# Altium PCB Grabber.PCBDOC (part 4 of 5)
Units mm, origin at the board's own origin, x right, y up, seen from the top; angles counter-clockwise.
Board outline 72.5 x 100 mm, 4 copper layers (TopLayer, Internal Plane 2, Layer 1, Bottom Layer), stack 1.543 mm thick; 160 components, 116 nets, 692 pads, 242 vias.
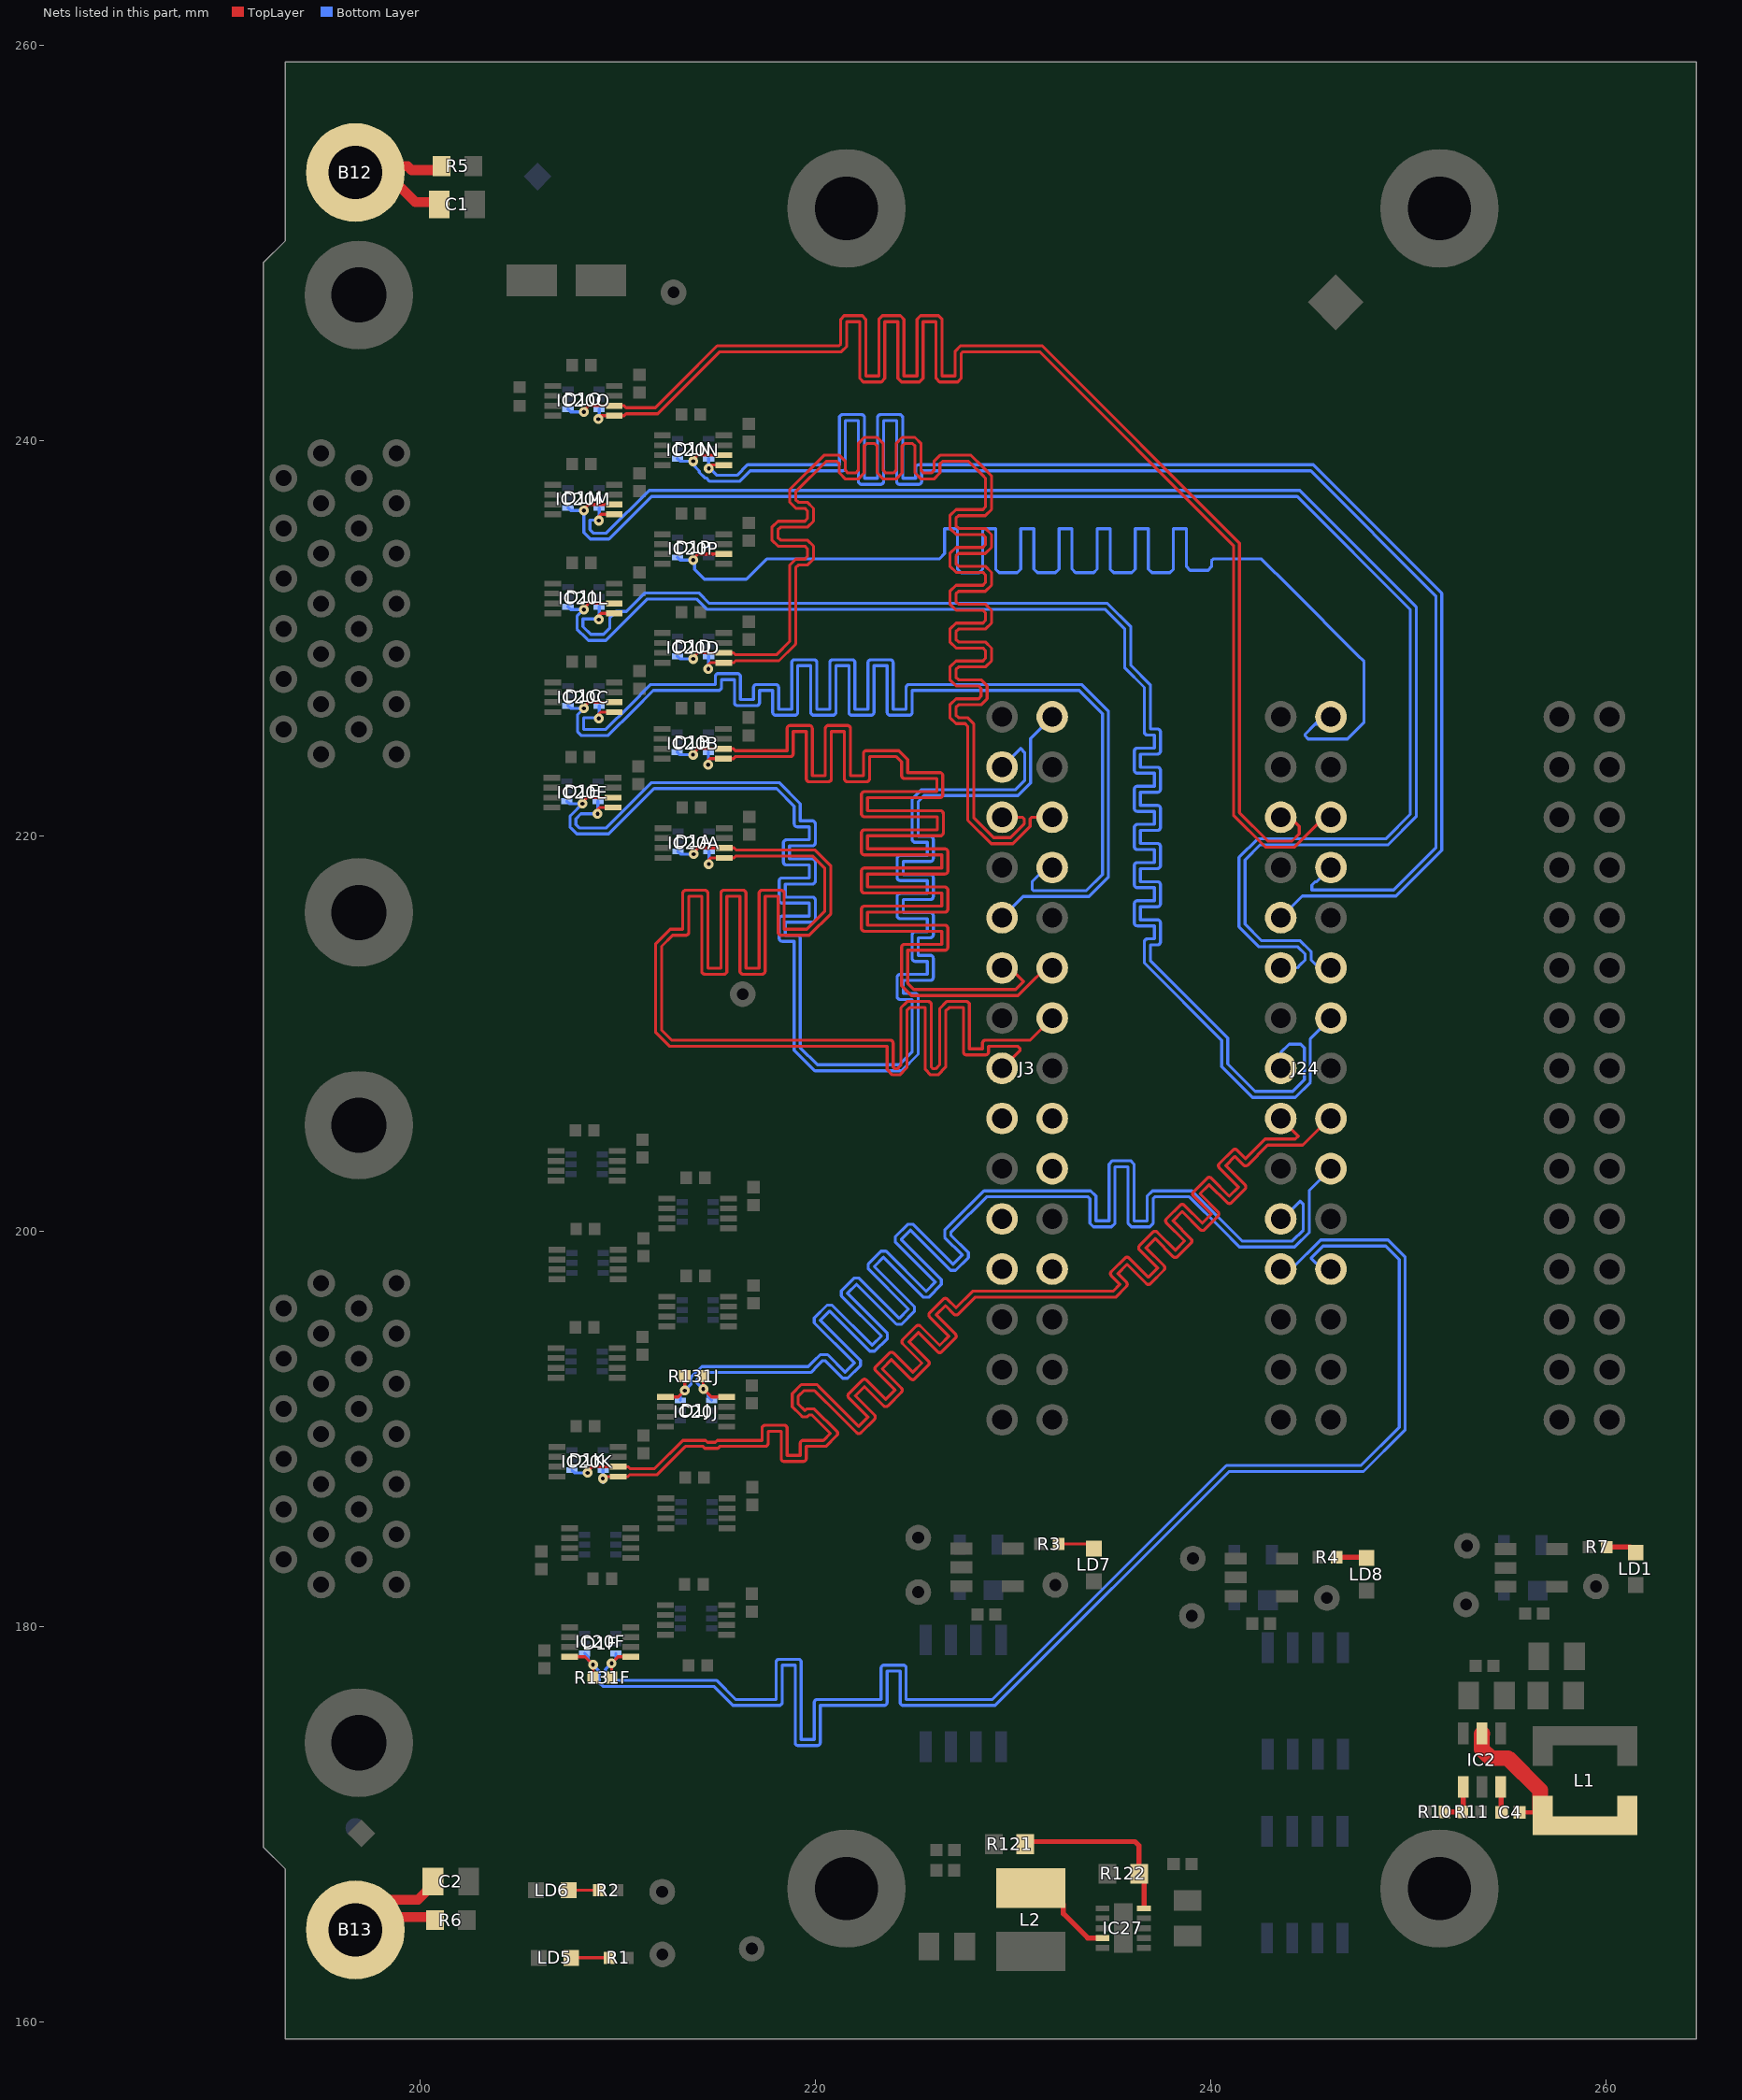
[diagram p5: the nets of this part, all layers, seen from the top]

## Via types
v1: diameter 0.5, hole 0.2, TopLayer to Bottom Layer, tented both sides, 242 vias

## Nets (pads, with @x,y where several pads share a name; then routed paths per layer and width w, separated by ;. In a path a pad name is that pad's centre, name@x,y a point inside that pad or via, vN(x,y) a via of type N, cw(c..) or ccw(c..) an arc to the next point about the centre after c; other vN are vias at no path point) (continued)
LVDS8_P: D1P.1 IC20P.6 J24.2 | length 78.1
  TopLayer w0.152: v1(213.838,233.965) 213.838,234.034 214.077,234.273 IC20P.6@215.377,234.273
  Bottom Layer w0.152: D1P.1@213.037,234.098 213.17,233.965 v1(213.838,233.965) 213.905,233.899 213.905,233.49 214.402,232.993 216.528,232.993 217.558,234.023 225.992,234.023 226.284,234.023 226.552,234.291 226.552,235.547 227.212,235.547 227.212,233.505 227.391,233.326 228.304,233.326 228.482,233.505 228.482,235.547 229.142,235.547 229.142,233.505 229.321,233.326 230.234,233.326 230.412,233.505 230.412,235.547 231.073,235.547 231.073,233.505 231.251,233.326 232.164,233.326 232.343,233.505 232.343,235.547 233.003,235.547 233.003,233.505 233.182,233.326 234.095,233.326 234.273,233.505 234.273,235.547 234.934,235.547 234.934,233.505 235.112,233.326 236.025,233.326 236.204,233.505 236.204,235.547 236.864,235.547 236.864,233.505 237.043,233.326 237.956,233.326 238.134,233.505 238.134,235.547 238.794,235.547 238.794,233.63 238.973,233.451 239.886,233.451 240.064,233.63 240.064,233.934 240.154,234.023 240.436,234.023 242.582,234.023 244.043,232.562 247.438,229.167 247.777,228.829 247.777,225.755 246.939,224.917 244.945,224.917 244.793,225.069 244.793,225.159 245.288,225.654 ; 245.288,225.654 245.669,226.035 J24.2@246.101,226.035 245.72,225.654 245.288,225.654
LVDS9_N: D1O.6 IC20O.5 J24.6 | length 75.7
  TopLayer w0.152: v1(209.042,241.098) 209.042,241.148 209.168,241.273 IC20O.5@209.842,241.273 210.344,241.273 210.441,241.371 212.049,241.371 215.178,244.5 220.701,244.5 221.336,244.5 221.604,244.768 221.604,246.024 222.264,246.024 222.264,243.155 222.443,242.976 223.356,242.976 223.534,243.155 223.534,246.024 224.195,246.024 224.195,243.155 224.373,242.976 225.286,242.976 225.465,243.155 225.465,246.024 226.125,246.024 226.125,243.155 226.304,242.976 227.217,242.976 227.395,243.155 227.395,244.411 227.484,244.5 227.65,244.5 231.369,244.5 241.173,234.696 241.173,221.057 242.787,219.443 244.258,219.443 245.77,220.955 J24.6@246.101,220.955
  Bottom Layer w0.152: v1(209.042,241.098) 209.042,241.015 209.082,240.974 D1O.6@209.082,241.598
LVDS9_P: D1O.1 IC20O.6 J24.5 | length 76
  TopLayer w0.152: v1(208.303,241.465) 208.303,241.534 208.542,241.773 IC20O.6@209.842,241.773 210.344,241.773 210.441,241.676 211.923,241.676 213.096,242.849 215.052,244.805 220.701,244.805 221.21,244.805 221.299,244.894 221.299,246.151 221.478,246.329 222.391,246.329 222.569,246.151 222.569,243.281 223.23,243.281 223.23,246.151 223.408,246.329 224.321,246.329 224.5,246.151 224.5,243.281 225.16,243.281 225.16,246.151 225.339,246.329 226.251,246.329 226.43,246.151 226.43,243.281 227.09,243.281 227.09,244.537 227.358,244.805 227.65,244.805 231.495,244.805 241.478,234.822 241.478,221.183 242.913,219.748 244.132,219.748 244.5,220.116 244.5,220.497 244.043,220.955 J24.5@243.561,220.955
  Bottom Layer w0.152: D1O.1@207.502,241.598 207.635,241.465 v1(208.303,241.465)
LVDS10_N: D1N.6 IC20N.5 J24.9 | length 76.7
  TopLayer w0.152: v1(214.627,238.596) 214.627,238.698 214.703,238.773 IC20N.5@215.377,238.773
  Bottom Layer w0.152: D1N.6@214.617,239.098 v1@214.617,238.679 ; v1(214.627,238.596) 214.627,238.669 v1@214.617,238.679 ; J24.9@243.561,215.875 244.653,216.967 245.135,216.967 249.402,216.967 251.714,219.279 251.714,232.282 245.211,238.785 225.247,238.785 ccw(c225.247,238.633) 225.095,238.633 225.095,238.1 224.434,238.1 224.434,241.173 ccw(c224.282,241.173) 224.282,241.325 223.317,241.325 ccw(c223.317,241.173) 223.164,241.173 223.164,238.1 222.504,238.1 222.504,241.173 ccw(c222.352,241.173) 222.352,241.325 221.386,241.325 ccw(c221.386,241.173) 221.234,241.173 221.234,238.785 216.586,238.785 216.052,238.252 215.045,238.252 v1@214.617,238.679
LVDS10_P: D1N.1 IC20N.6 J24.8 | length 77.6
  TopLayer w0.152: v1(213.838,238.965) 213.838,239.034 214.077,239.273 IC20N.6@215.377,239.273
  Bottom Layer w0.152: D1N.1@213.037,239.098 213.17,238.965 v1(213.838,238.965) 213.838,238.782 214.149,238.471 214.149,238.398 214.429,238.118 214.502,238.118 214.673,237.947 215.045,237.947 216.179,237.947 216.712,238.481 221.386,238.481 ccw(c221.386,238.633) 221.539,238.633 221.539,241.021 222.199,241.021 222.199,237.947 ccw(c222.352,237.947) 222.352,237.795 223.317,237.795 ccw(c223.317,237.947) 223.469,237.947 223.469,241.021 224.13,241.021 224.13,237.947 ccw(c224.282,237.947) 224.282,237.795 225.247,237.795 ccw(c225.247,237.947) 225.4,237.947 225.4,238.481 245.085,238.481 251.409,232.156 251.409,219.405 249.276,217.272 245.135,217.272 245.135,217.526 245.3,217.691 245.377,217.691 J24.8@246.101,218.415
LVDS11_N: D1M.6 IC20M.5 J24.12 | length 77
  TopLayer w0.152: v1(209.065,235.964) 209.065,236.178 209.168,236.28 IC20M.5@209.842,236.28
  Bottom Layer w0.152: 208.763,235.331 209.448,235.331 211.607,237.49 222.162,237.49 233.21,237.49 244.525,237.49 250.419,231.596 250.419,220.982 248.994,219.558 242.518,219.558 241.757,218.796 241.757,215.544 242.595,214.706 244.551,214.706 245.008,214.249 245.098,214.16 245.098,213.741 J24.12@245.339,213.5 ; 208.763,235.356 208.61,235.509 208.61,235.994 209.036,235.994 v1(209.065,235.964) 209.082,235.981 D1M.6@209.082,236.605 ; J24.12@245.504,213.335 J24.12@245.339,213.5 ; J24.12@246.101,213.335 245.935,213.5 J24.12@245.339,213.5
LVDS11_P: D1M.1 IC20M.6 J24.11 | length 77.9
  TopLayer w0.152: v1(208.303,236.472) 208.303,236.541 208.542,236.78 IC20M.6@209.842,236.78
  Bottom Layer w0.152: D1M.1@207.502,236.605 207.635,236.472 v1(208.303,236.472) 208.303,235.359 208.636,235.026 209.575,235.026 211.734,237.185 222.036,237.185 233.336,237.185 244.399,237.185 250.114,231.47 250.114,221.108 248.868,219.862 242.392,219.862 241.452,218.923 241.452,215.418 242.38,214.491 242.469,214.401 244.425,214.401 244.793,214.033 244.793,213.729 244.552,213.488 244.399,213.335 J24.11@243.561,213.335
LVDS12_N: D1L.6 IC20L.5 J24.15 | length 75.7
  TopLayer w0.152: v1(209.065,230.957) 209.065,231.171 209.168,231.273 IC20L.5@209.842,231.273
  Bottom Layer w0.152: D1L.6@209.082,231.598 209.082,230.974 v1(209.065,230.957) 209.036,230.987 208.262,230.987 208.262,230.599 208.657,230.204 209.298,230.204 209.613,230.519 209.613,231.042 209.94,231.369 210.464,231.369 211.397,232.303 214.122,232.303 214.644,231.781 234.791,231.781 235.979,230.593 235.979,228.637 236.967,227.649 236.967,225.418 237.322,225.418 cw(c237.322,225.266) 237.475,225.266 237.475,224.301 cw(c237.322,224.301) 237.322,224.148 236.459,224.148 236.459,223.488 237.322,223.488 cw(c237.322,223.335) 237.475,223.335 237.475,222.37 cw(c237.322,222.37) 237.322,222.218 236.459,222.218 236.459,221.557 237.322,221.557 cw(c237.322,221.405) 237.475,221.405 237.475,220.44 cw(c237.322,220.44) 237.322,220.287 236.459,220.287 236.459,219.627 237.322,219.627 cw(c237.322,219.475) 237.475,219.475 237.475,218.509 cw(c237.322,218.509) 237.322,218.357 236.459,218.357 236.459,217.697 237.322,217.697 cw(c237.322,217.544) 237.475,217.544 237.475,216.579 cw(c237.322,216.579) 237.322,216.427 236.459,216.427 236.459,215.766 237.322,215.766 cw(c237.322,215.614) 237.475,215.614 237.475,214.649 cw(c237.322,214.649) 237.322,214.496 236.967,214.496 236.967,213.705 240.792,209.88 240.881,209.791 240.881,208.469 242.264,207.086 244.17,207.086 244.754,207.67 244.754,209.296 244.577,209.474 243.992,209.474 243.561,209.042 J24.15@243.561,208.255
LVDS12_P: D1L.1 IC20L.6 J24.14 | length 76.8
  TopLayer w0.152: v1(208.303,231.465) 208.303,231.534 208.542,231.773 IC20L.6@209.842,231.773
  Bottom Layer w0.152: D1L.1@207.502,231.598 207.635,231.465 v1(208.303,231.465) 207.958,231.12 207.958,230.473 208.442,229.989 208.531,229.9 209.425,229.9 209.514,229.989 211.523,231.998 213.996,231.998 214.518,231.476 234.665,231.476 235.674,230.467 235.674,228.511 236.662,227.523 236.662,225.266 ccw(c236.814,225.266) 236.814,225.113 237.17,225.113 237.17,224.453 236.306,224.453 ccw(c236.306,224.301) 236.154,224.301 236.154,223.335 ccw(c236.306,223.335) 236.306,223.183 237.17,223.183 237.17,222.523 236.306,222.523 ccw(c236.306,222.37) 236.154,222.37 236.154,221.405 ccw(c236.306,221.405) 236.306,221.253 237.17,221.253 237.17,220.592 236.306,220.592 ccw(c236.306,220.44) 236.154,220.44 236.154,219.475 ccw(c236.306,219.475) 236.306,219.322 237.17,219.322 237.17,218.662 236.306,218.662 ccw(c236.306,218.509) 236.154,218.509 236.154,217.544 ccw(c236.306,217.544) 236.306,217.392 237.17,217.392 237.17,216.731 236.306,216.731 ccw(c236.306,216.579) 236.154,216.579 236.154,215.614 ccw(c236.306,215.614) 236.306,215.461 237.17,215.461 237.17,214.801 236.814,214.801 ccw(c236.814,214.649) 236.662,214.649 236.662,213.579 240.576,209.665 240.576,208.343 242.138,206.781 244.296,206.781 245.059,207.544 245.059,209.753 J24.14@246.101,210.795
LVDS13_N: D1K.6 IC20K.5 J24.18 | length 78.1
  TopLayer w0.152: v1(209.266,187.503) 209.363,187.599 IC20K.5@210.037,187.599 210.539,187.599 210.636,187.697 212.013,187.697 213.444,189.128 214.33,189.128 214.433,189.025 215.082,189.025 215.185,189.128 217.475,189.128 ccw(c217.475,189.281) 217.627,189.281 217.627,189.89 218.288,189.89 218.288,188.519 ccw(c218.44,188.519) 218.44,188.366 219.405,188.366 ccw(c219.405,188.519) 219.558,188.519 219.558,189.128 220.553,189.128 221.1,189.676 ccw(c220.993,189.784) 221.145,189.784 ccw(c220.993,189.784) 221.1,189.891 ; 221.1,189.892 219.971,191.021 219.571,191.021 219.481,190.932 219.151,191.262 219.151,191.668 219.431,191.948 219.978,191.948 220.084,191.841 221.136,190.789 221.305,190.621 222.106,189.82 ccw(c222.214,189.927) 222.322,189.82 ; 222.322,189.82 223.004,190.502 ; 223.004,190.718 222.034,191.688 222.501,192.154 223.471,191.185 ccw(c223.579,191.292) 223.687,191.185 ; 223.004,190.502 ccw(c222.896,190.61) 223.049,190.61 ccw(c222.896,190.61) 223.004,190.718 ; 223.687,191.185 224.369,191.867 ccw(c224.261,191.975) 224.414,191.975 ccw(c224.261,191.975) 224.369,192.083 223.399,193.053 223.866,193.519 224.836,192.55 ccw(c224.944,192.657) 225.052,192.55 225.734,193.232 ccw(c225.626,193.34) 225.779,193.34 ccw(c225.626,193.34) 225.734,193.448 224.764,194.418 225.231,194.884 226.201,193.915 ccw(c226.309,194.022) 226.417,193.915 227.099,194.597 ccw(c226.991,194.705) 227.144,194.705 ccw(c226.991,194.705) 227.099,194.813 226.129,195.783 226.596,196.249 227.027,195.818 ccw(c227.135,195.926) 227.243,195.818 ; 227.243,195.819 228.097,196.672 235.203,196.672 235.751,197.22 ccw(c235.643,197.327) 235.795,197.327 ccw(c235.643,197.327) 235.75,197.436 235.32,197.866 235.787,198.333 236.757,197.363 ccw(c236.864,197.471) 236.973,197.364 237.655,198.046 ccw(c237.547,198.154) 237.699,198.154 ccw(c237.547,198.154) 237.654,198.262 236.744,199.172 237.211,199.639 238.122,198.728 ccw(c238.229,198.836) 238.338,198.729 239.02,199.411 ccw(c238.912,199.519) 239.064,199.519 ccw(c238.912,199.519) 239.02,199.626 238.109,200.537 238.576,201.004 239.487,200.093 ccw(c239.594,200.201) 239.703,200.094 240.384,200.775 ccw(c240.277,200.884) 240.429,200.884 ccw(c240.277,200.884) 240.384,200.992 239.474,201.902 239.941,202.369 240.852,201.458 ccw(c240.959,201.566) 241.068,201.459 241.75,202.141 ccw(c241.642,202.249) 241.794,202.249 ccw(c241.642,202.249) 241.75,202.356 240.78,203.326 241.247,203.793 241.678,203.362 ccw(c241.786,203.47) 241.894,203.363 242.899,204.368 244.677,204.368 246.024,205.715 J24.18@246.101,205.715
  Bottom Layer w0.152: v1(209.266,187.503) 209.266,187.312 209.277,187.3 D1K.6@209.277,187.924
LVDS13_P: D1K.1 IC20K.6 J24.17 | length 78
  TopLayer w0.152: v1(208.498,187.791) 208.498,187.86 208.737,188.099 IC20K.6@210.037,188.099 210.539,188.099 210.636,188.002 211.887,188.002 213.318,189.433 214.456,189.433 214.559,189.33 214.956,189.33 215.059,189.433 217.322,189.433 217.322,190.043 cw(c217.475,190.043) 217.475,190.195 218.44,190.195 cw(c218.44,190.043) 218.592,190.043 218.592,188.671 219.253,188.671 219.253,189.281 cw(c219.405,189.281) 219.405,189.433 220.427,189.433 220.777,189.784 219.845,190.716 219.697,190.716 219.608,190.627 219.355,190.627 219.266,190.716 218.846,191.136 218.846,191.795 219.304,192.253 220.104,192.253 220.3,192.057 222.214,190.143 222.681,190.61 221.712,191.579 cw(c221.819,191.688) 221.711,191.795 222.394,192.478 cw(c222.501,192.37) 222.609,192.478 223.579,191.508 224.046,191.975 223.076,192.945 cw(c223.184,193.053) 223.076,193.16 ; 223.077,193.161 223.759,193.843 cw(c223.866,193.735) 223.974,193.843 224.944,192.873 225.411,193.34 224.442,194.309 ; 224.441,194.31 cw(c224.549,194.418) 224.441,194.525 225.123,195.207 ; 225.124,195.208 cw(c225.231,195.1) 225.339,195.208 226.309,194.238 226.776,194.705 225.806,195.675 cw(c225.914,195.783) 225.806,195.89 ; 225.807,195.891 226.489,196.573 cw(c226.596,196.465) 226.704,196.573 227.135,196.142 227.97,196.977 235.077,196.977 235.427,197.327 234.996,197.759 cw(c235.104,197.866) 234.997,197.975 235.679,198.657 cw(c235.787,198.549) 235.895,198.656 236.864,197.687 237.331,198.154 236.421,199.064 cw(c236.528,199.172) 236.42,199.28 237.103,199.963 cw(c237.211,199.855) 237.319,199.962 238.229,199.052 238.696,199.519 237.785,200.429 cw(c237.893,200.537) 237.786,200.645 238.468,201.328 cw(c238.576,201.22) 238.684,201.327 239.594,200.417 240.061,200.884 239.151,201.794 cw(c239.258,201.902) 239.15,202.01 239.833,202.693 cw(c239.941,202.585) 240.049,202.693 240.959,201.782 241.426,202.249 240.456,203.219 cw(c240.564,203.326) 240.457,203.435 241.139,204.117 cw(c241.247,204.009) 241.354,204.117 241.786,203.686 242.773,204.673 244.297,204.673 244.45,204.826 J24.17@243.561,205.715
  Bottom Layer w0.152: D1K.1@207.697,187.924 207.83,187.791 v1(208.498,187.791)
LVDS14_N: D1J.3 IC20J.1 J24.21 R131J.1 | length 77.2
  TopLayer w0.152: IC20J.1@212.434,191.624 213.084,191.624 v1(213.409,191.949) R131J.1@213.409,192.674
  Bottom Layer w0.152: D1J.3@213.194,191.449 213.194,191.734 v1(213.409,191.949) 213.727,192.267 213.727,192.619 214.275,193.167 219.659,193.167 219.939,193.446 220.259,193.767 220.638,193.767 221.526,192.879 221.993,193.346 219.964,195.375 219.964,195.627 220.61,196.273 220.862,196.273 222.891,194.244 223.358,194.711 221.329,196.74 221.329,196.992 221.975,197.638 222.227,197.638 224.256,195.609 224.723,196.076 222.694,198.105 222.694,198.357 223.34,199.003 223.592,199.003 225.621,196.974 226.088,197.441 224.059,199.47 224.059,199.722 224.705,200.368 224.957,200.368 226.986,198.339 227.453,198.806 226.565,199.694 226.565,200.073 226.771,200.279 228.549,202.057 233.477,202.057 233.945,202.057 234.213,201.789 234.213,200.537 234.873,200.537 234.873,203.402 235.052,203.581 235.964,203.581 236.143,203.402 236.143,200.533 236.803,200.533 236.803,201.789 237.071,202.057 237.363,202.057 239.064,202.057 241.604,199.517 244.145,199.517 244.704,200.076 244.704,201.371 244.538,201.536 243.637,200.635 J24.21@243.561,200.635
LVDS14_P: D1J.4 IC20J.8 J24.20 R131J.2 | length 78.1
  TopLayer w0.152: R131J.2@214.349,192.674 v1(214.349,192.028) 214.753,191.624 IC20J.8@215.534,191.624
  Bottom Layer w0.152: D1J.4@214.774,191.449 214.584,191.639 214.584,191.793 v1(214.349,192.028) 214.032,192.346 214.032,192.493 214.401,192.862 219.785,192.862 220.154,193.231 220.385,193.462 220.512,193.462 221.4,192.574 221.652,192.574 222.298,193.219 222.298,193.472 220.269,195.501 220.736,195.968 222.765,193.939 223.017,193.939 223.663,194.584 223.663,194.837 221.634,196.866 222.101,197.333 224.13,195.304 224.382,195.304 225.028,195.949 225.028,196.202 222.999,198.231 223.466,198.698 225.495,196.669 225.747,196.669 226.393,197.314 226.393,197.567 224.364,199.596 224.831,200.063 226.86,198.034 227.112,198.034 227.758,198.679 227.758,198.932 226.87,199.82 226.87,199.946 226.987,200.063 228.675,201.752 233.477,201.752 233.819,201.752 233.908,201.663 233.908,200.411 234.086,200.233 234.999,200.233 235.178,200.411 235.178,203.276 235.838,203.276 235.838,200.407 236.017,200.228 236.93,200.228 237.108,200.407 237.108,201.663 237.198,201.752 237.363,201.752 238.938,201.752 240.538,200.152 241.478,199.212 244.271,199.212 245.008,199.95 245.008,202.082 J24.20@246.101,203.175
LVDS15_N: D1F.3 IC20F.1 J24.24 R131F.1 | length 75.7
  TopLayer w0.152: R131F.1@209.71,177.43 v1(209.71,178.155) 210.035,178.48 IC20F.1@210.685,178.48
  Bottom Layer w0.152: D1F.3@209.925,178.655 209.925,178.37 v1(209.71,178.155) 209.393,177.838 209.393,177.292 215.011,177.292 215.976,176.327 218.034,176.327 218.034,178.206 cw(c218.186,178.206) 218.186,178.359 219.151,178.359 cw(c219.151,178.206) 219.304,178.206 219.304,174.295 219.964,174.295 219.964,176.174 cw(c220.116,176.174) 220.116,176.327 223.342,176.327 223.342,177.909 cw(c223.495,177.909) 223.495,178.061 224.46,178.061 cw(c224.46,177.909) 224.612,177.909 224.612,176.327 228.981,176.327 240.817,188.163 247.625,188.163 249.555,190.094 249.555,198.577 248.869,199.263 245.707,199.263 245.098,198.653 245.656,198.095 J24.24@246.101,198.095
LVDS15_P: D1F.4 IC20F.8 J24.23 R131F.2 | length 78.1
  TopLayer w0.152: IC20F.8@207.585,178.48 208.366,178.48 v1(208.77,178.076) R131F.2@208.77,177.43
  Bottom Layer w0.152: D1F.4@208.345,178.655 208.535,178.465 208.535,178.311 v1(208.77,178.076) 209.088,177.759 209.088,177.166 209.267,176.987 214.885,176.987 215.761,176.111 215.85,176.022 218.186,176.022 ccw(c218.186,176.174) 218.338,176.174 218.338,178.054 218.999,178.054 218.999,174.142 ccw(c219.151,174.142) 219.151,173.99 220.116,173.99 ccw(c220.116,174.142) 220.269,174.142 220.269,176.022 223.495,176.022 ccw(c223.495,176.174) 223.647,176.174 223.647,177.756 224.307,177.756 224.307,176.174 ccw(c224.46,176.174) 224.46,176.022 229.107,176.022 229.197,176.111 240.944,187.858 247.751,187.858 249.771,189.878 249.86,189.967 249.86,198.703 249.771,198.793 248.995,199.568 245.581,199.568 244.108,198.095 J24.23@243.561,198.095
LVDS16_N: D1E.6 IC20E.5 J3.3 | length 75
  TopLayer w0.152: v1@208.916,221.048 v1(209,221.132) 209,221.346 209.103,221.448 IC20E.5@209.777,221.448
  Bottom Layer w0.152: D1E.6@209.017,221.773 209.017,221.149 v1(209,221.132) 208.189,221.132 208.175,221.146 207.908,220.879 207.908,220.583 208.076,220.414 209.442,220.414 211.735,222.707 218.185,222.707 219.253,221.64 219.253,220.777 219.862,220.777 cw(c219.862,220.624) 220.015,220.624 220.015,219.659 cw(c219.862,219.659) 219.862,219.507 218.705,219.507 218.705,218.846 219.862,218.846 cw(c219.862,218.694) 220.015,218.694 220.015,217.729 cw(c219.862,217.729) 219.862,217.576 218.491,217.576 218.491,216.916 219.862,216.916 cw(c219.862,216.764) 220.015,216.764 220.015,215.798 cw(c219.862,215.798) 219.862,215.646 218.491,215.646 218.491,214.986 219.1,214.986 cw(c219.1,214.833) 219.253,214.833 219.253,209.296 220.116,208.432 224.257,208.432 224.917,209.093 224.917,211.734 224.307,211.734 cw(c224.307,211.887) 224.155,211.887 224.155,212.852 cw(c224.307,212.852) 224.307,213.004 225.679,213.004 225.679,213.665 225.069,213.665 cw(c225.069,213.817) 224.917,213.817 224.917,215.011 cw(c225.069,215.011) 225.069,215.163 225.679,215.163 225.679,215.824 224.307,215.824 cw(c224.307,215.976) 224.155,215.976 224.155,216.941 cw(c224.307,216.941) 224.307,217.094 225.679,217.094 225.679,217.754 224.307,217.754 cw(c224.307,217.907) 224.155,217.907 224.155,218.872 cw(c224.307,218.872) 224.307,219.024 225.679,219.024 225.679,219.685 225.069,219.685 cw(c225.069,219.837) 224.917,219.837 224.917,221.88 225.389,222.352 230.149,222.352 230.606,222.808 230.606,224.232 230.403,224.434 J3.3@229.464,223.495
LVDS16_P: D1E.1 IC20E.6 J3.2 | length 77.2
  TopLayer w0.152: v1(208.238,221.64) 208.238,221.709 208.477,221.948 IC20E.6@209.777,221.948
  Bottom Layer w0.152: D1E.1@207.437,221.773 207.57,221.64 v1(208.238,221.64) 207.693,221.095 207.603,221.005 207.603,220.456 207.693,220.367 207.861,220.199 207.95,220.11 209.569,220.11 211.861,222.402 218.059,222.402 218.948,221.513 218.948,220.624 ccw(c219.1,220.624) 219.1,220.472 219.71,220.472 219.71,219.812 218.552,219.812 ccw(c218.552,219.659) 218.4,219.659 218.4,218.694 ccw(c218.552,218.694) 218.552,218.542 219.71,218.542 219.71,217.881 218.338,217.881 ccw(c218.338,217.729) 218.186,217.729 218.186,216.764 ccw(c218.338,216.764) 218.338,216.611 219.71,216.611 219.71,215.951 218.338,215.951 ccw(c218.338,215.798) 218.186,215.798 218.186,214.833 ccw(c218.338,214.833) 218.338,214.681 218.948,214.681 218.948,209.17 219.99,208.128 224.383,208.128 225.222,208.967 225.222,211.887 ccw(c225.069,211.887) 225.069,212.039 224.46,212.039 224.46,212.7 225.831,212.7 ccw(c225.831,212.852) 225.984,212.852 225.984,213.817 ccw(c225.831,213.817) 225.831,213.97 225.222,213.97 225.222,214.859 225.831,214.859 ccw(c225.831,215.011) 225.984,215.011 225.984,215.976 ccw(c225.831,215.976) 225.831,216.129 224.46,216.129 224.46,216.789 225.831,216.789 ccw(c225.831,216.941) 225.984,216.941 225.984,217.907 ccw(c225.831,217.907) 225.831,218.059 224.46,218.059 224.46,218.719 225.831,218.719 ccw(c225.831,218.872) 225.984,218.872 225.984,219.837 ccw(c225.831,219.837) 225.831,219.989 225.222,219.989 225.222,221.754 225.515,222.047 230.276,222.047 230.911,222.682 230.911,224.232 230.911,224.942 J3.2@232.004,226.035
LVDS17_N: D1D.6 IC20D.5 J3.6 | length 76
  TopLayer w0.152: v1(214.6,228.457) 214.6,228.671 214.703,228.773 IC20D.5@215.377,228.773 215.879,228.773 215.976,228.871 218.177,228.871 218.935,229.629 219.024,229.718 219.024,233.304 219.024,233.582 219.155,233.713 219.615,233.713 219.924,234.022 219.924,234.666 219.615,234.975 218.255,234.975 218.124,235.105 218.124,235.497 218.255,235.627 219.615,235.627 219.924,235.936 219.924,236.58 219.615,236.889 219.155,236.889 219.024,237.02 219.024,237.185 219.024,237.414 220.576,238.965 220.802,238.965 221.102,238.965 221.232,238.835 221.232,238.374 221.541,238.065 222.185,238.065 222.494,238.374 222.494,239.735 222.624,239.865 223.016,239.865 223.146,239.735 223.146,238.374 223.455,238.065 224.099,238.065 224.408,238.374 224.408,239.735 224.539,239.865 224.93,239.865 225.061,239.735 225.061,238.374 225.37,238.065 226.014,238.065 226.323,238.374 226.323,238.835 226.453,238.965 227.766,238.965 228.495,238.236 228.626,238.105 228.626,237.043 ; 228.626,236.931 228.626,237.043 ; J3.6@232.004,220.955 230.975,220.955 230.886,220.865 230.886,220.491 230.016,219.621 228.911,219.621 227.726,220.807 227.726,224.184 227.726,225.557 227.595,225.687 227.135,225.687 226.826,225.996 226.826,226.64 227.135,226.949 228.273,226.949 228.403,227.08 228.403,227.471 228.273,227.602 227.135,227.602 226.826,227.911 226.826,228.555 227.135,228.864 228.495,228.864 228.626,228.994 228.626,229.385 228.495,229.516 227.135,229.516 226.826,229.825 226.826,230.469 227.135,230.778 228.495,230.778 228.626,230.908 228.626,231.3 228.495,231.43 227.135,231.43 226.826,231.739 226.826,232.383 227.135,232.692 228.495,232.692 228.626,232.823 228.626,233.214 228.495,233.345 227.135,233.345 226.826,233.654 226.826,234.298 227.135,234.607 228.495,234.607 228.626,234.737 228.626,235.129 228.495,235.259 227.135,235.259 226.826,235.568 226.826,236.212 227.135,236.521 228.495,236.521 228.626,236.652 228.626,237.043
  Bottom Layer w0.152: v1(214.6,228.457) 214.617,228.474 D1D.6@214.617,229.098
LVDS17_P: D1D.1 IC20D.6 J3.5 | length 76.3
  TopLayer w0.152: v1(213.838,228.965) 213.838,229.034 214.077,229.273 IC20D.6@215.377,229.273 215.879,229.273 215.976,229.176 218.051,229.176 218.719,229.845 218.719,233.304 218.719,233.709 219.028,234.018 219.489,234.018 219.619,234.148 219.619,234.54 219.489,234.67 218.128,234.67 217.819,234.979 217.819,235.623 218.128,235.932 219.489,235.932 219.619,236.063 219.619,236.454 219.489,236.584 219.028,236.584 218.719,236.893 218.719,237.185 218.719,237.54 220.45,239.27 220.802,239.27 221.228,239.27 221.537,238.961 221.537,238.501 221.667,238.37 222.059,238.37 222.189,238.501 222.189,239.861 222.498,240.17 223.142,240.17 223.451,239.861 223.451,238.501 223.582,238.37 223.973,238.37 224.104,238.501 224.104,239.861 224.413,240.17 225.057,240.17 225.366,239.861 225.366,238.501 225.496,238.37 225.888,238.37 226.018,238.501 226.018,238.961 226.327,239.27 226.58,239.27 227.892,239.27 228.495,238.667 228.931,238.231 228.931,237.169 ; 228.931,237.057 228.931,237.169 ; J3.5@229.464,220.955 230.492,220.955 230.581,220.865 230.581,220.618 229.89,219.926 229.038,219.926 228.031,220.933 228.031,224.184 228.031,225.683 227.722,225.992 227.261,225.992 227.131,226.122 227.131,226.514 227.261,226.644 228.399,226.644 228.708,226.953 228.708,227.597 228.399,227.906 227.261,227.906 227.131,228.037 227.131,228.428 227.261,228.559 228.622,228.559 228.931,228.868 228.931,229.512 228.622,229.821 227.261,229.821 227.131,229.951 227.131,230.343 227.261,230.473 228.622,230.473 228.931,230.782 228.931,231.426 228.622,231.735 227.261,231.735 227.131,231.866 227.131,232.257 227.261,232.388 228.622,232.388 228.931,232.697 228.931,233.341 228.622,233.65 227.261,233.65 227.131,233.78 227.131,234.171 227.261,234.302 228.622,234.302 228.931,234.611 228.931,235.255 228.622,235.564 227.261,235.564 227.131,235.694 227.131,236.086 227.261,236.216 228.622,236.216 228.931,236.525 228.931,237.169
  Bottom Layer w0.152: D1D.1@213.037,229.098 213.17,228.965 v1(213.838,228.965)
LVDS18_N: D1C.6 IC20C.5 J3.9 | length 77.9
  TopLayer w0.152: v1@209.036,225.987 v1(209.065,225.957) ; v1@209.103,225.92 v1(209.065,225.957) ; IC20C.5@209.842,226.273 209.168,226.273 209.065,226.171 v1(209.065,225.957)
  Bottom Layer w0.152: D1C.6@209.082,226.598 209.082,225.974 v1(209.065,225.957) 209.036,225.987 208.295,225.987 208.295,225.4 209.418,225.4 210.614,226.596 211.691,227.673 214.96,227.673 214.96,228.072 cw(c215.113,228.072) 215.113,228.224 216.078,228.224 cw(c216.078,228.072) 216.23,228.072 216.23,226.909 216.891,226.909 216.891,227.52 cw(c217.043,227.52) 217.043,227.673 218.008,227.673 cw(c218.008,227.52) 218.161,227.52 218.161,226.419 218.821,226.419 218.821,228.773 cw(c218.973,228.773) 218.973,228.926 219.939,228.926 cw(c219.939,228.773) 220.091,228.773 220.091,226.419 220.751,226.419 220.751,228.773 cw(c220.904,228.773) 220.904,228.926 221.869,228.926 cw(c221.869,228.773) 222.021,228.773 222.021,226.419 222.682,226.419 222.682,228.773 cw(c222.834,228.773) 222.834,228.926 223.799,228.926 cw(c223.799,228.773) 223.952,228.773 223.952,226.419 224.612,226.419 224.612,227.52 cw(c224.765,227.52) 224.765,227.673 232.41,227.673 ; J3.9@229.464,215.875 230.53,216.941 233.857,216.941 233.946,217.031 ; 232.41,227.673 233.489,227.673 ; 232.41,227.673 233.489,227.673 ; 233.489,227.673 234.848,226.313 ; 233.489,227.673 234.848,226.313 ; 233.946,217.031 234.848,217.933 ; 233.946,217.031 234.848,217.933 ; 234.848,217.933 234.848,226.313 ; 234.848,217.933 234.848,226.313
LVDS18_P: D1C.1 IC20C.6 J3.8 | length 77
  TopLayer w0.152: v1@208.303,226.412 v1(208.303,226.465) 208.303,226.534 208.542,226.773 IC20C.6@209.842,226.773
  Bottom Layer w0.152: D1C.1@207.502,226.598 207.635,226.465 v1(208.303,226.465) 207.99,226.152 207.99,225.273 208.169,225.095 209.544,225.095 210.83,226.381 211.817,227.368 215.113,227.368 ccw(c215.113,227.52) 215.265,227.52 215.265,227.92 215.925,227.92 215.925,226.757 ccw(c216.078,226.757) 216.078,226.604 217.043,226.604 ccw(c217.043,226.757) 217.195,226.757 217.195,227.368 217.856,227.368 217.856,226.267 ccw(c218.008,226.267) 218.008,226.115 218.973,226.115 ccw(c218.973,226.267) 219.126,226.267 219.126,228.621 219.786,228.621 219.786,226.267 ccw(c219.939,226.267) 219.939,226.115 220.904,226.115 ccw(c220.904,226.267) 221.056,226.267 221.056,228.621 221.717,228.621 221.717,226.267 ccw(c221.869,226.267) 221.869,226.115 222.834,226.115 ccw(c222.834,226.267) 222.987,226.267 222.987,228.621 223.647,228.621 223.647,226.267 ccw(c223.799,226.267) 223.799,226.115 224.765,226.115 ccw(c224.765,226.267) 224.917,226.267 224.917,227.368 232.41,227.368 233.363,227.368 ; J3.8@232.004,218.415 231.699,218.415 230.988,217.703 230.988,217.297 231.038,217.246 233.731,217.246 ; 232.562,227.368 233.363,227.368 ; 233.363,227.368 234.544,226.187 ; 233.363,227.368 234.544,226.187 ; 233.731,217.246 234.544,218.059 ; 233.731,217.246 234.544,218.059 ; 234.544,218.059 234.544,226.187 ; 234.544,218.059 234.544,226.187
LVDS19_N: D1B.6 IC20B.5 J3.12 | length 75.4
  TopLayer w0.152: v1(214.59,223.607) 214.59,223.821 214.693,223.923 IC20B.5@215.367,223.923 215.869,223.923 215.966,224.021 218.745,224.021 ccw(c218.745,224.173) 218.897,224.173 218.897,225.291 219.558,225.291 219.558,222.903 ccw(c219.71,222.903) 219.71,222.751 220.675,222.751 ccw(c220.675,222.903) 220.828,222.903 220.828,225.291 221.488,225.291 221.488,222.903 ccw(c221.64,222.903) 221.64,222.751 222.606,222.751 ccw(c222.606,222.903) 222.758,222.903 222.758,224.021 224.115,224.021 224.384,223.752 224.384,223.063 ccw(c224.536,223.063) 224.536,222.91 226.162,222.91 226.162,222.25 222.504,222.25 ccw(c222.504,222.098) 222.352,222.098 222.352,221.132 ccw(c222.504,221.132) 222.504,220.98 226.187,220.98 226.187,220.32 222.504,220.32 ccw(c222.504,220.167) 222.352,220.167 222.352,219.202 ccw(c222.504,219.202) 222.504,219.05 226.416,219.05 226.416,218.389 222.504,218.389 ccw(c222.504,218.237) 222.352,218.237 222.352,217.272 ccw(c222.504,217.272) 222.504,217.119 226.416,217.119 226.416,216.459 222.504,216.459 ccw(c222.504,216.306) 222.352,216.306 222.352,215.341 ccw(c222.504,215.341) 222.504,215.189 226.416,215.189 226.416,214.528 224.536,214.528 ccw(c224.536,214.376) 224.384,214.376 224.384,212.432 224.878,211.938 230.276,211.938 230.771,212.433 231.673,213.335 J3.12@232.004,213.335
  Bottom Layer w0.152: v1(214.59,223.607) 214.607,223.624 D1B.6@214.607,224.248
LVDS19_P: D1B.1 IC20B.6 J3.11 | length 76.2
  TopLayer w0.152: v1(213.828,224.115) 213.828,224.184 214.067,224.423 IC20B.6@215.367,224.423 215.869,224.423 215.966,224.326 218.592,224.326 218.592,225.443 cw(c218.745,225.443) 218.745,225.596 219.71,225.596 cw(c219.71,225.443) 219.862,225.443 219.862,223.056 220.523,223.056 220.523,225.443 cw(c220.675,225.443) 220.675,225.596 221.64,225.596 cw(c221.64,225.443) 221.793,225.443 221.793,223.056 222.453,223.056 222.453,224.173 cw(c222.606,224.173) 222.606,224.326 224.241,224.326 224.688,223.878 224.688,223.215 226.314,223.215 cw(c226.314,223.063) 226.466,223.063 226.466,222.098 cw(c226.314,222.098) 226.314,221.945 222.656,221.945 222.656,221.285 226.339,221.285 cw(c226.339,221.132) 226.491,221.132 226.491,220.167 cw(c226.339,220.167) 226.339,220.015 222.656,220.015 222.656,219.354 226.568,219.354 cw(c226.568,219.202) 226.72,219.202 226.72,218.237 cw(c226.568,218.237) 226.568,218.084 222.656,218.084 222.656,217.424 226.568,217.424 cw(c226.568,217.272) 226.72,217.272 226.72,216.306 cw(c226.568,216.306) 226.568,216.154 222.656,216.154 222.656,215.494 226.568,215.494 cw(c226.568,215.341) 226.72,215.341 226.72,214.376 cw(c226.568,214.376) 226.568,214.224 224.688,214.224 224.688,212.558 225.004,212.242 230.149,212.242 230.556,212.649 229.87,213.335 J3.11@229.464,213.335
  Bottom Layer w0.152: D1B.1@213.027,224.248 213.16,224.115 v1(213.828,224.115) ; J3.11@229.464,213.335 J3.11@229.894,213.335
LVDS20_N: D1A.6 IC20A.5 J3.15 | length 75.9
  TopLayer w0.152: v1(214.625,218.583) 214.625,218.797 214.728,218.899 IC20A.5@215.402,218.899 215.904,218.899 216.001,218.997 219.864,218.997 220.497,218.364 220.497,216.205 219.583,215.29 218.44,215.29 218.44,217.109 ccw(c218.288,217.109) 218.288,217.262 217.322,217.262 ccw(c217.322,217.109) 217.17,217.109 217.17,213.319 216.51,213.319 216.51,217.109 ccw(c216.357,217.109) 216.357,217.262 215.392,217.262 ccw(c215.392,217.109) 215.24,217.109 215.24,213.319 214.579,213.319 214.579,217.109 ccw(c214.427,217.109) 214.427,217.262 213.462,217.262 ccw(c213.462,217.109) 213.309,217.109 213.309,215.29 212.675,215.29 211.938,214.553 211.938,210.058 212.624,209.372 223.647,209.372 223.647,208.192 223.915,207.924 224.294,207.924 224.65,208.281 224.65,211.187 224.791,211.328 225.577,211.328 225.577,208.192 225.845,207.924 226.224,207.924 226.612,208.312 226.612,211.156 226.784,211.328 227.508,211.328 227.508,209.086 ccw(c227.66,209.086) 227.66,208.934 228.625,208.934 ccw(c228.625,209.086) 228.778,209.086 228.778,209.372 230.251,209.372 230.378,209.245 230.378,209.169 J3.15@229.464,208.255
  Bottom Layer w0.152: v1(214.625,218.583) 214.642,218.6 D1A.6@214.642,219.224
LVDS20_P: D1A.1 IC20A.6 J3.14 | length 77.5
  TopLayer w0.152: v1(213.863,219.091) 213.863,219.16 214.102,219.399 IC20A.6@215.402,219.399 215.904,219.399 216.001,219.302 219.99,219.302 220.802,218.49 220.802,216.079 219.709,214.986 218.288,214.986 cw(c218.288,215.138) 218.135,215.138 218.135,216.957 217.475,216.957 217.475,213.167 cw(c217.322,213.167) 217.322,213.014 216.357,213.014 cw(c216.357,213.167) 216.205,213.167 216.205,216.957 215.544,216.957 215.544,213.167 cw(c215.392,213.167) 215.392,213.014 214.427,213.014 cw(c214.427,213.167) 214.274,213.167 214.274,216.957 213.614,216.957 213.614,215.138 cw(c213.462,215.138) 213.462,214.986 212.801,214.986 212.243,214.427 212.243,210.185 212.75,209.677 223.799,209.677 cw(c223.799,209.525) 223.952,209.525 223.952,208.318 224.041,208.229 224.167,208.229 224.345,208.407 224.345,211.313 224.664,211.633 225.73,211.633 cw(c225.73,211.48) 225.882,211.48 225.882,208.318 225.971,208.229 226.098,208.229 226.307,208.439 226.307,211.282 226.658,211.633 227.66,211.633 cw(c227.66,211.48) 227.813,211.48 227.813,209.239 228.473,209.239 228.473,209.525 cw(c228.625,209.525) 228.625,209.677 230.251,209.677 230.886,209.677 J3.14@232.004,210.795
  Bottom Layer w0.152: D1A.1@213.062,219.224 213.195,219.091 v1(213.863,219.091)
LVDS21_N: J3.18
LVDS21_P: J3.17
LVDS22_N: J3.21
LVDS22_P: J3.20
LVDS23_N: J3.24
LVDS23_P: J3.23
NetB12_1: B12.1 C1.1 R5.2 | length 9.8
  TopLayer w0.508: C1.1@200.991,251.951 200.991,252.069 199.784,252.069 198.285,253.568 B12.1@196.748,253.568 197.079,253.898 199.393,253.898 199.595,253.696 201.113,253.696 R5.2@201.113,253.898
NetB13_1: B13.1 C2.1 R6.2 | length 8.6
  TopLayer w0.508: B13.1@196.748,164.668 B13.1@197.393,165.313 ; C2.1@200.674,167.106 200.674,166.956 199.91,166.192 198.272,166.192 B13.1@197.393,165.313 ; R6.2@200.774,165.156 200.774,165.313 B13.1@197.393,165.313
NetC4_1: C4.1 IC2.6 | length 1.3
  TopLayer w0.254: C4.1@254.635,170.637 254.716,170.719 254.716,171.883 IC2.6@254.696,171.903
NetC4_2: C4.2 IC2.2 L1.1 | length 6.3
  TopLayer w0.203: C4.2@255.637,170.612 256.311,170.612 L1.1@256.362,170.663
  TopLayer w0.8: IC2.2@253.746,174.603 253.721,174.578 253.721,173.824 254.189,173.355 255.067,173.355 256.692,171.729 L1.1@256.692,170.84
NetIC2_4: IC2.4 R10.1 R11.2 | length 2
  TopLayer w0.254: R10.1@251.968,170.713 251.968,170.686 252.017,170.637 R11.2@252.755,170.637 ; R11.2@252.73,170.764 252.74,170.764 252.796,170.82 IC2.4@252.796,171.903
NetIC27_5: IC27.5 R121.1 R122.2 | length 9.2
  TopLayer w0.254: R121.1@230.642,169.006 230.769,169.133 236.19,169.133 236.392,168.931 R122.2@236.392,167.506 236.642,167.256 IC27.5@236.642,165.756
NetIC27_9: IC27.9 L2.1 | length 4.9
  TopLayer w0.254: L2.1@230.911,166.776 231.735,166.776 232.563,165.948 232.563,165.485 233.792,164.256 IC27.9@234.542,164.256
NetLD1_2: LD1.2 R7.2 | length 1.6
  TopLayer w0.254: R7.2@260.058,184.032 261.243,184.032 LD1.2@261.518,183.756
NetLD5_2: LD5.2 R1.1 | length 1.9
  TopLayer w0.152: LD5.2@207.667,163.256 R1.1@209.592,163.256
NetLD6_2: LD6.2 R2.2 | length 1.5
  TopLayer w0.152: LD6.2@207.53,166.675 R2.2@209.065,166.675
NetLD7_2: LD7.2 R3.2 | length 1.9
  TopLayer w0.152: R3.2@232.321,184.19 233.881,184.19 LD7.2@234.112,183.959
NetLD8_2: LD8.2 R4.2 | length 1.5
  TopLayer w0.254: R4.2@246.393,183.516 247.863,183.516 LD8.2@247.903,183.476